# Altium PCB PCB_RR-Updates-v1.0.PcbDoc (part 1 of 2)
Units mil, origin at the board's own origin, x right, y up, seen from the top; angles counter-clockwise.
Board outline 3045 x 2450 mil, 2 copper layers (Top Layer, Bottom Layer), stack 62.205 mil thick; 73 components, 57 nets, 209 pads, 80 vias.
Unrouted connection lines stored in the file: 2.
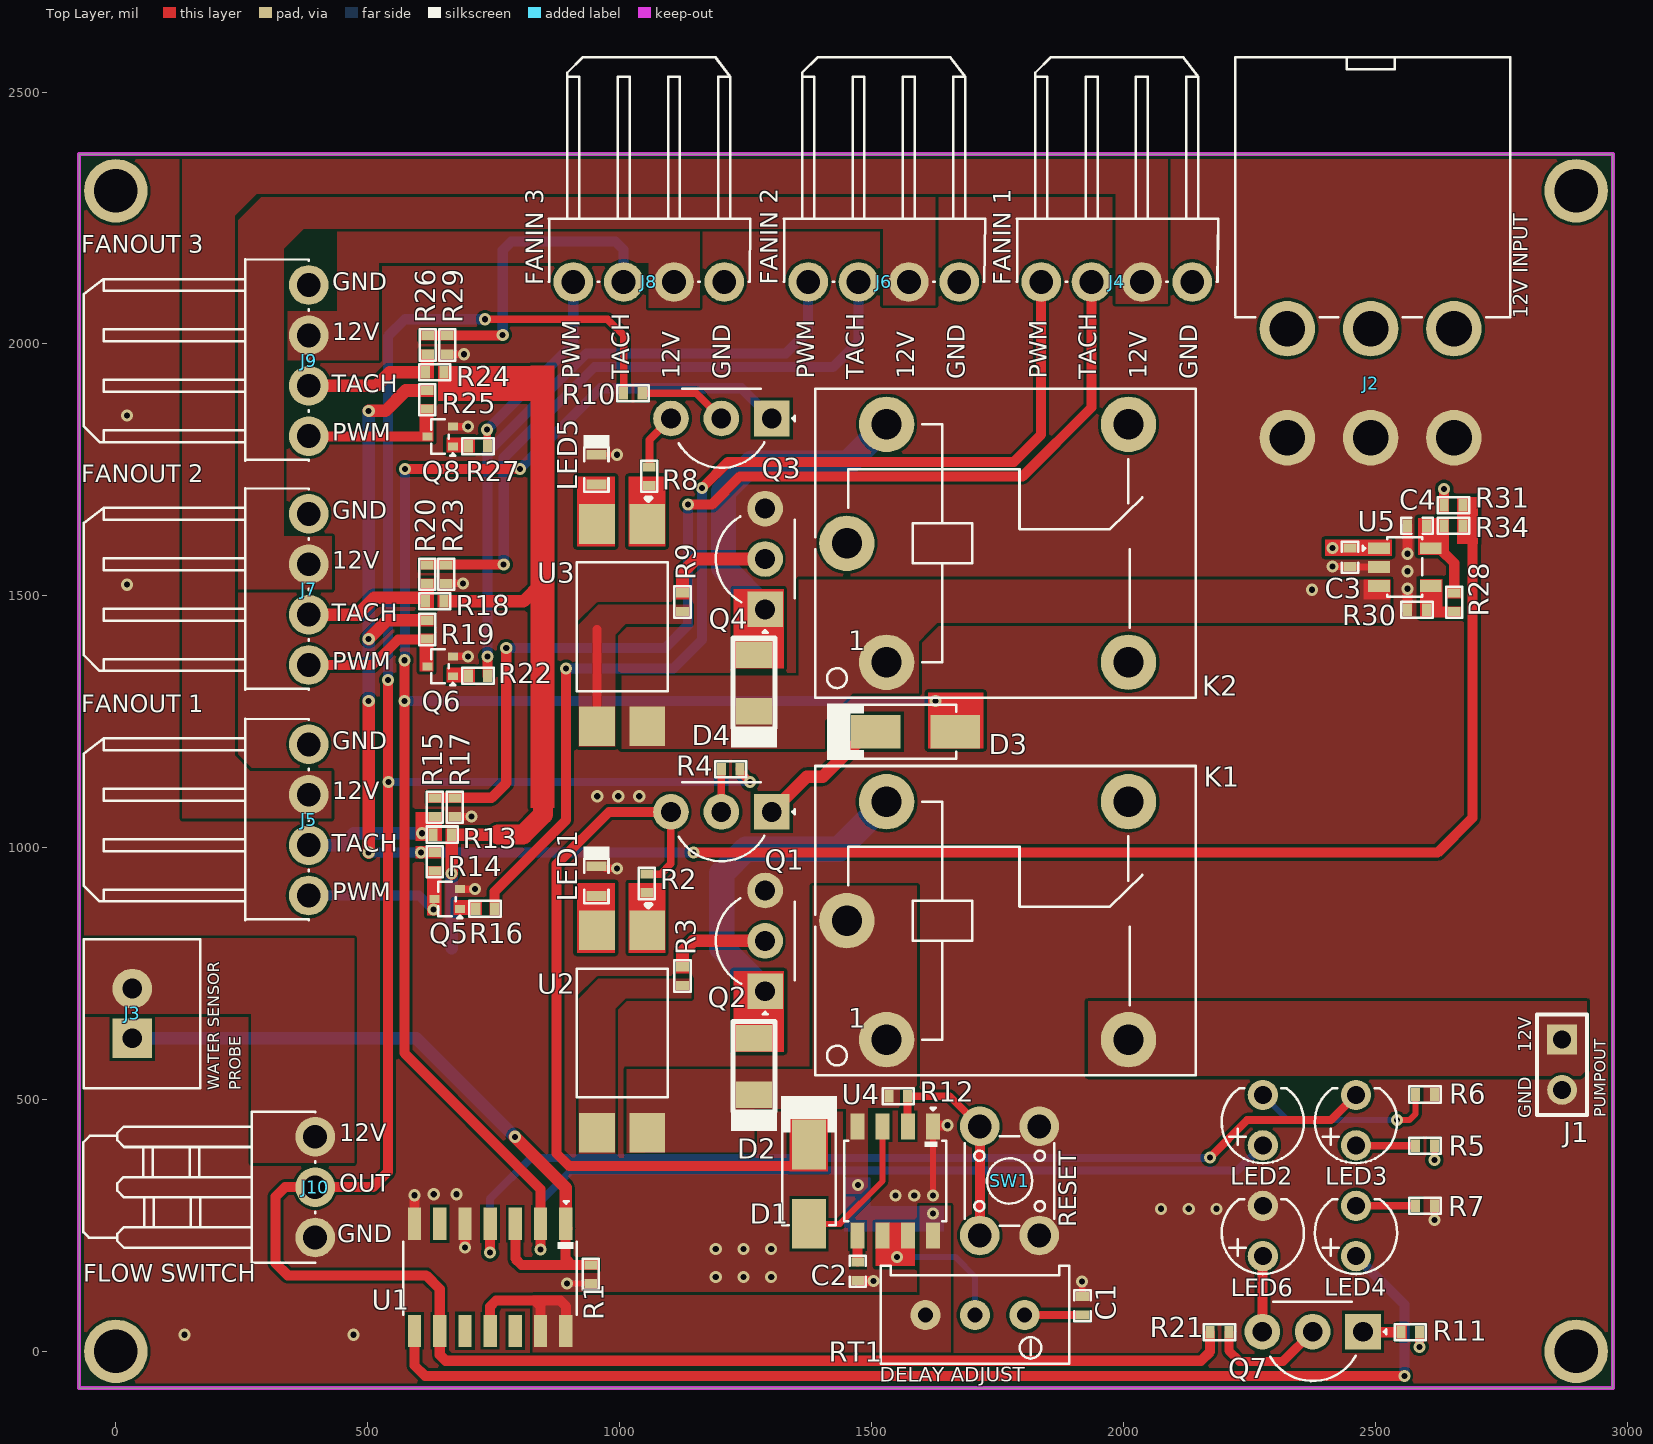
[diagram p0: Top Layer view]
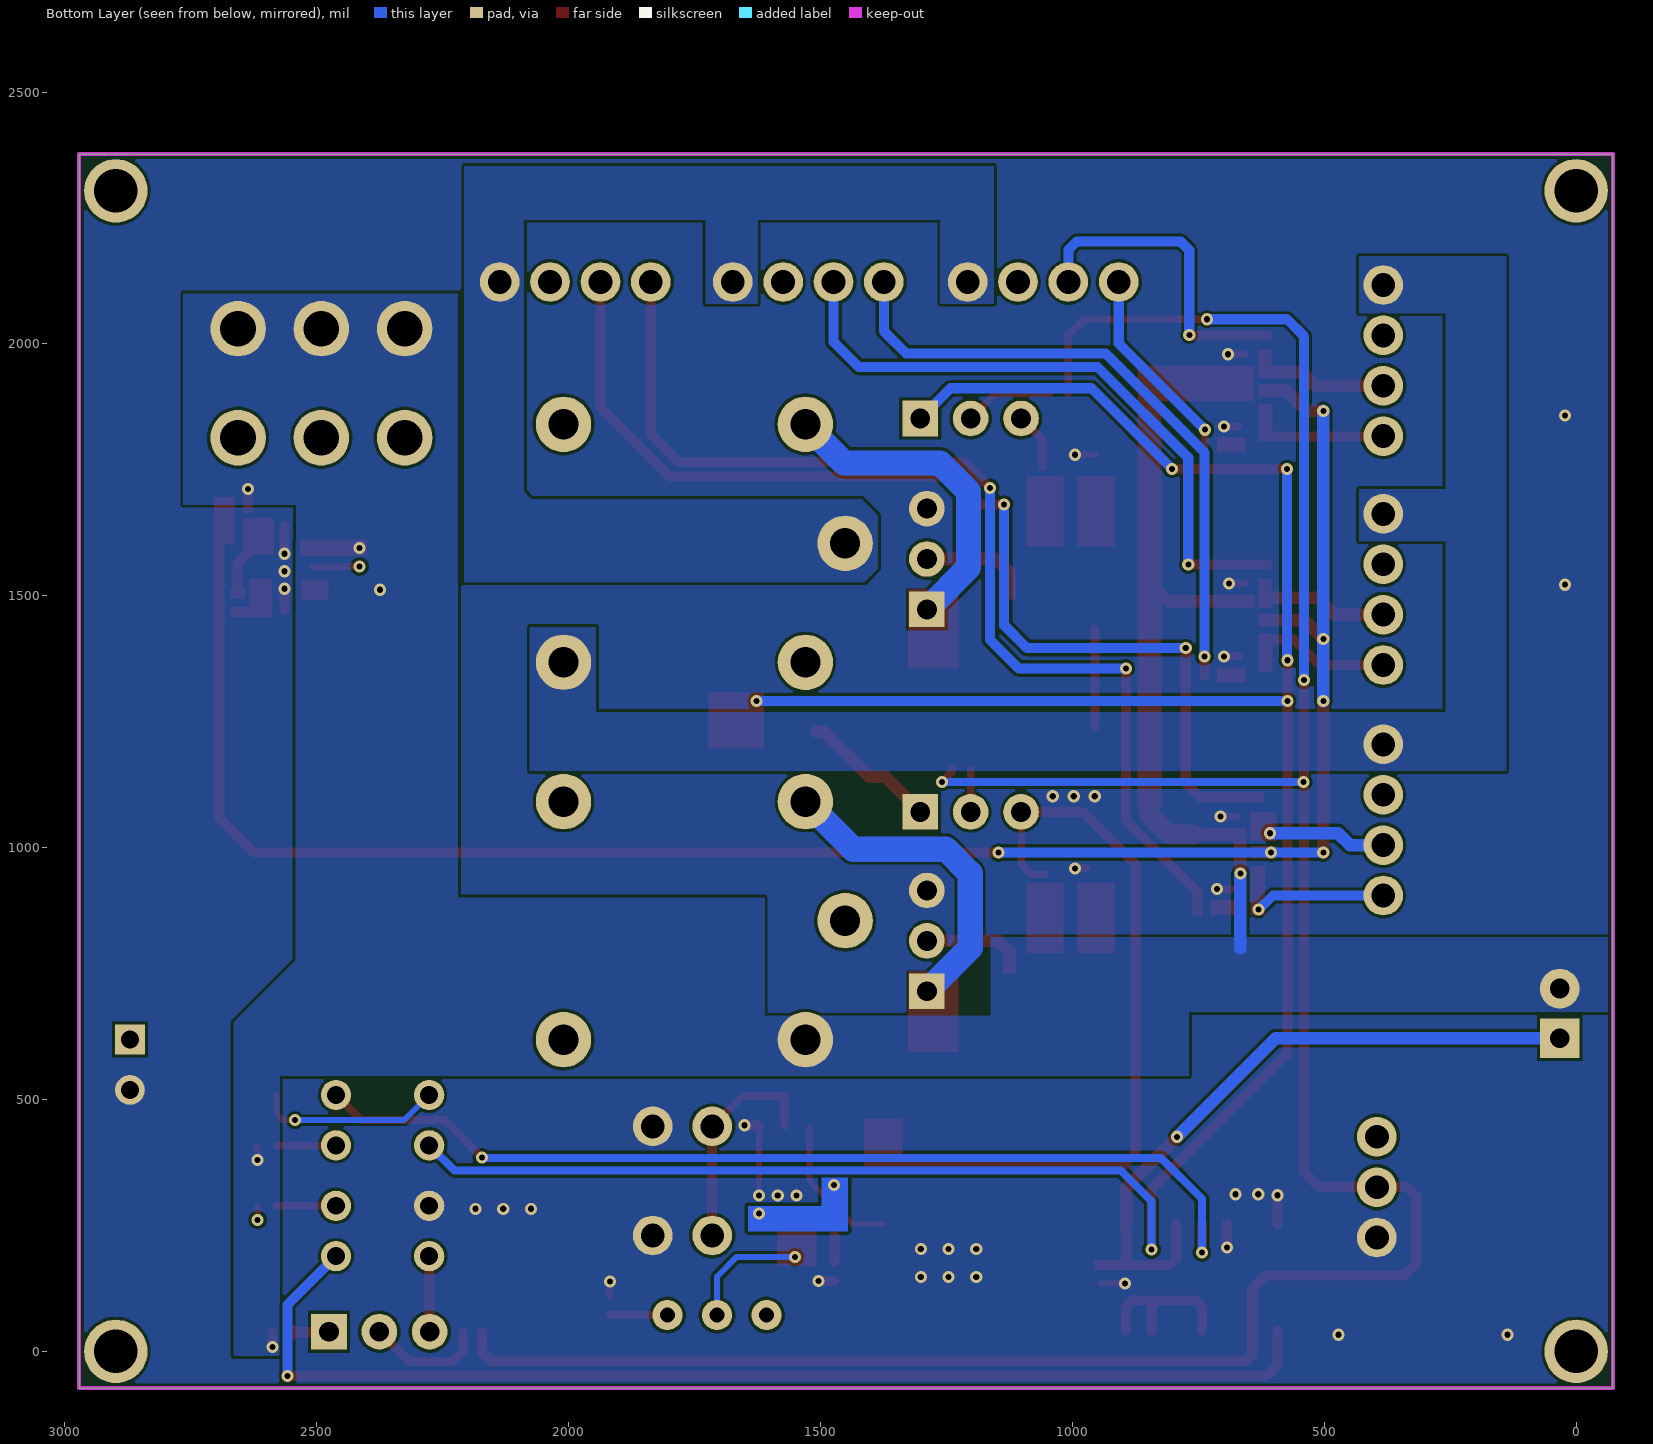
[diagram p1: Bottom Layer view, seen from below]
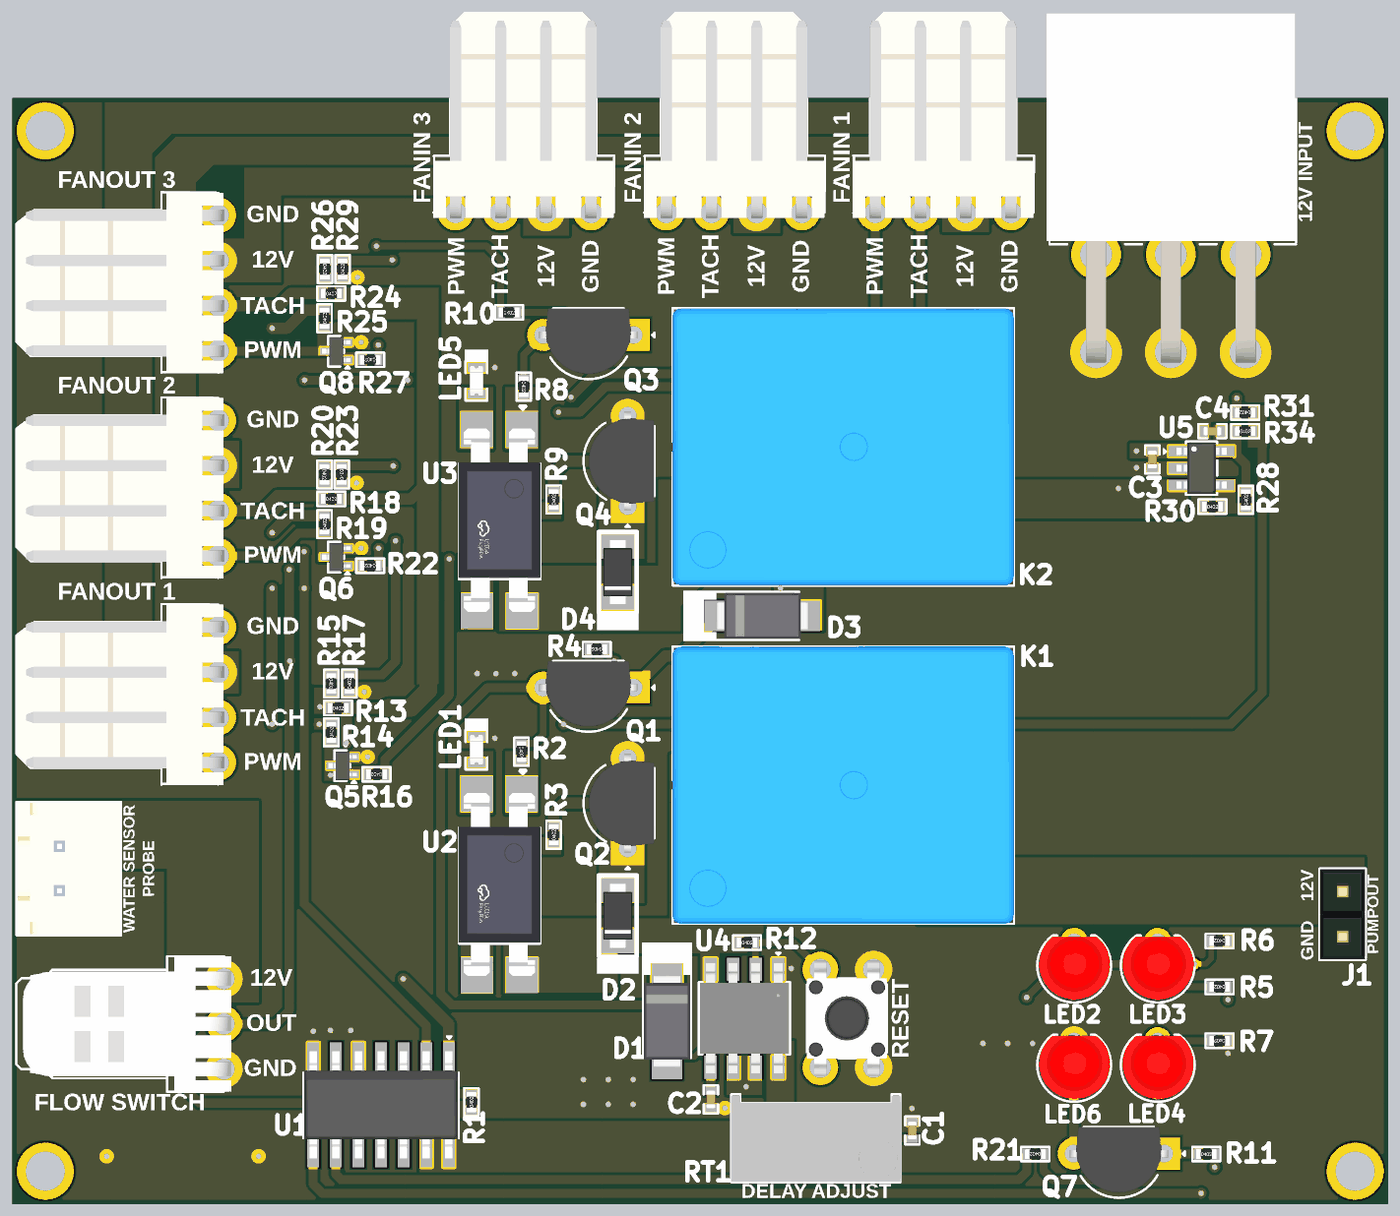
[diagram p2: 3D render of the assembled board from above, using the file's embedded part models]

## Layer stack, top to bottom
Top Solder: solder mask 0.3937, Solder Resist, Dk 3.3
Top Layer: signal copper 1.378
Dielectric 1: dielectric 59.4488, FR-4, Dk 4.5
Bottom Layer: signal copper 1.378
Bottom Solder: solder mask 0.3937, Solder Resist, Dk 3.3

## Board outline
-73,-73 2972,-73 2972,2377 -73,2377

## Design rules (kind name [scope] priority, off if disabled: settings)
BoardOutlineClearance [All] p1: gap=0 ignorepadtopadclearanceinfootprint=FALSE except(10: Poly-OutlineEdge)
Clearance [All] p1: gap=6 ignorepadtopadclearanceinfootprint=FALSE except(0: Arc-Hole Track-Hole SMDPad-Hole THPad-Hole Via-Hole Fill-Hole Poly-Hole Region-Hole Text-Hole)
HoleToHoleClearance [All] p1: gap=0 allowstackedmicrovias=TRUE
MinimumSolderMaskSliver [All] p1: minsoldermaskwidth=0
PolygonConnect [All] p1: connectstyle=Direct reliefconductorwidth=10 reliefentries=4 polygonreliefangle="90 Angle" airgapwidth=10
RoutingVias [All] p1: holewidth=12 width=24 viastyle="Through Hole" minholewidth=12 minwidth=24 maxholewidth=2362 maxwidth=3938
SilkToSilkClearance [All] p1: silktosilkclearance=0
SilkToSolderMaskClearance [IsPad] p1: minsilkscreentomaskgap=0 clearancetoexposedcopper=TRUE
SolderMaskExpansion [All] p1: expansion=4 istentingtop=FALSE
UnRoutedNet [All] p1: checkbadconnections=TRUE
Width [All] p1: maxlimit=100 minlimit=10 preferedwidth=10
25 further rules are at their usual default settings.

## Components (designator, comment, footprint, x,y, rotation, side; value= is the part's Value field where it differs from the comment)
C1 "10nF" Cap-0402 1919,90.5 r270 top locked
C2 "10nF" Cap-0402 1473,159 r90 top
C3 "10uF" Cap-0402 2450,1576.5 r90 top locked
C4 "10uF" Cap-0402 2583,1639 r0 top locked
D1 "SS34" SMA 1376,332 r270 top locked
D2 "SM4007PL A7 46MIL" SOD-123FL 1267,565.7 r90 top locked
D3 "SS34" SMA 1587.26,1230 r0 top locked
D4 "SM4007PL A7 46MIL" SOD-123FL 1267,1326.7 r90 top locked
J1 "X6511WV-02H-C60D30" HDR1X2_ 2871,619 r270 top locked
J2 "4.2-2*3AW" 4.2-2*3AW 2491,1922 r180 top locked
J3 "B2B-XH-A(LF)(SN)" B2B-XH-A(LF)(SN)_ 32.69,671 r90 top locked
J4 "HC-2510-4AW" HC-2510-4AW 1987,2123 r180 top locked
J5 "HC-2510-4AW" HC-2510-4AW 383,1055 r270 top locked
J6 "HC-2510-4AW" HC-2510-4AW 1524.36,2123 r180 top locked
J7 "HC-2510-4AW" HC-2510-4AW 383,1512.64 r270 top locked
J8 "HC-2510-4AW" HC-2510-4AW 1058,2123 r180 top locked
J9 "HC-2510-4AW" HC-2510-4AW 383,1967 r270 top locked
J10 "KH-HX2.54-03PW" KH-HX2.54-03PW 395.54,326 r270 top locked
K1 "SRD-12VDC-SL-C" SRD-12VDC-SL-C 1730.79,855 r0 top locked
K2 "SRD-12VDC-SL-C" SRD-12VDC-SL-C 1730.79,1604.22 r0 top locked
LED1 "Blue" LED-0603 954,933.53 r90 top locked
LED2 "Green-yellow" "TH LED Green 3MM" 2277,459 r90 top locked
LED3 "204-10SURD/S530-A3-L" "TH LED Red 3MM" 2462,459 r90 top locked
LED4 "204-10SURD/S530-A3-L" "TH LED Red 3MM" 2462,239 r90 top locked
LED5 "Blue" LED-0603 954,1750.53 r90 top locked
LED6 "Green-yellow" "TH LED Green 3MM" 2277,239 r90 top locked
Q1 "BC547BTA" TO-92-3L 1202,1071 r180 top locked
Q2 "BC547BTA" TO-92-3L 1288.95,815 r90 top locked
Q3 "BC547BTA" TO-92-3L 1202,1852 r180 top locked
Q4 "BC547BTA" TO-92-3L 1288.95,1573 r90 top locked
Q5 "MMBT3904T-7-F" SOT-523 658,898 r90 top locked
Q6 "MMBT3904T-7-F" SOT-523 644,1360 r90 top locked
Q7 "BC547BTA" TO-92-3L 2376,39 r180 top locked
Q8 "MMBT3904T-7-F" SOT-523 644,1816 r90 top locked
R1 "10K" Res-0402 943,153 r90 top locked
R2 "470R" Res-0402 1054,929 r270 top locked
R3 "2.4k" Res-0402 1125,745 r90 top locked value=2.4kR
R4 "2.4k" Res-0402 1220.5,1156 r180 top locked value=2.4kR
R5 "470R" Res-0402 2599,408 r180 top locked
R6 "470R" Res-0402 2599,510 r180 top locked
R7 "470R" Res-0402 2599,289 r180 top locked
R8 "470R" Res-0402 1059,1737.5 r270 top locked
R9 "2.4k" Res-0402 1125,1487.5 r90 top locked value=2.4kR
R10 "2.4k" Res-0402 1026.5,1902 r0 top locked value=2.4kR
R11 "470R" Res-0402 2569.5,38 r0 top locked
R12 "10K" Res-0402 1553.14,506.36 r0 top locked
R13 "4.7K" Res-0402 648,1026 r0 top locked
R14 "4.7K" Res-0402 633,972 r90 top locked
R15 "27K" Res-0402 633,1080 r270 top locked value=27kR
R16 "4.7K" Res-0402 733,879 r180 top locked
R17 "10K" Res-0402 673,1080 r90 top locked
R18 "4.7K" Res-0402 633,1489 r0 top locked
R19 "4.7K" Res-0402 618,1433 r90 top locked
R20 "27K" Res-0402 618,1543 r270 top locked value=27kR
R21 "2.4k" Res-0402 2191,38 r180 top locked value=2.4kR
R22 "4.7K" Res-0402 719,1341 r180 top locked
R23 "10K" Res-0402 656,1543 r90 top locked
R24 "4.7K" Res-0402 633,1944 r0 top locked
R25 "4.7K" Res-0402 618,1889 r90 top locked
R26 "27K" Res-0402 619,1998 r270 top locked value=27kR
R27 "4.7K" Res-0402 719,1797 r180 top locked
R28 "100K" Res-0402 2657,1487 r90 top locked
R29 "10K" Res-0402 658,1998 r90 top locked
R30 "33K" Res-0402 2583,1472 r0 top locked
R31 "0R" Res-0402 2655.5,1680 r180 top locked
R34 "0R" Res-0402 2655.5,1639 r0 top locked
RT1 "3296W-1-105" 3296W-1-105 1705.58,72 r180 top locked
SW1 "TSC016A03526A" TSC016A03526A 1774.27,338.4 r270 top locked
U1 "HEF4069UBT,653" SOIC-14 743,147 r270 top locked
U2 "PC817C" PC817C 1005,635 r270 top locked
U3 "PC817C" PC817C 1005,1441.79 r270 top locked
U4 "NE555DTR(XBLW)" SOP-8 1547.27,338.4 r270 top locked
U5 "SPX3819M5-L-1-8/TR" SOT-23-5 2559,1557 r0 top locked

## Footprints (in the part's own frame and the unit in brackets; to place one, negate y for a bottom-side part, rotate by r counter-clockwise, add the part's x,y. Pads: shape width x height; smd on the part's side, far side on the other; paste and mask are expansions set on the pad)
4.2-2*3AW [mm]
  round 2.8 hole 1.8 paste+0 mask+0.051: 1(-4.2,-2.75) 2(-4.2,2.75) 3(0,-2.75) 4(0,2.75) 5(4.2,-2.75) 6(4.2,2.75)
  silkscreen extent -7.04,-16.43 6.82,-3.33, body extent -7,-16.32 7,3.32, height 10.7
3296W-1-105 [mil]
  round 60 hole 30 paste+0 mask+2: 1(-98.43,0) 2(0,0) 3(98.42,0)
  silkscreen extent -187,-98 187,96, body extent -188,-95 188,95, height 454
B2B-XH-A(LF)(SN)_ [mm]
  rect 2x2 hole 1: 1(-1.25,0)
  round 2 hole 1: 2(1.25,0)
  silkscreen extent -3.78,-3.43 3.74,2.44, body extent -3.72,-3.37 3.68,2.38, height 7
Cap-0402 [mil]
  rect 18x25 smd mask+2.36: 1(-18.5,0) 2(18.5,0)
  silkscreen extent -31,-16 31,16, body extent -20,-10 20,10, height 19
HC-2510-4AW [mm]
  round 2 hole 1.2 paste+0 mask+0.05: 1(-3.81,0) 2(-1.27,0) 3(1.27,0) 4(3.81,0)
  silkscreen extent -5.11,-11.34 5.05,0, body extent -5.08,-11.31 5.08,0.31, height 5.8
HDR1X2_ [mm] "CONN HEADER VERT 2POS 2.54MM"
  rect 1.5x1.5 hole 0.9: 1(0,0)
  round 1.5 hole 0.9: 2(2.54,0)
  silkscreen extent -1.27,-1.27 3.81,1.27, body extent -1.27,-1.27 3.81,1.27, height 8.44
KH-HX2.54-03PW [mm]
  round 2 hole 1.2 paste+0 mask+0.051: 1(-2.54,0) 2(0,0) 3(2.54,0)
  silkscreen extent -3.81,-11.68 3.81,0, body extent -3.81,-11.3 3.81,0.4, height 5.65
LED-0603 [mm]
  rect 0.5x1 smd: 1(-0.75,0) 2(0.75,0)
  silkscreen extent -1.12,-0.66 1.75,0.66, body extent -0.82,-0.37 0.82,0.36, height 0.68
PC817C [mm]
  rect 2x1.8 smd paste+0 mask+0.051: 1(-5.1,1.27) 2(-5.1,-1.27) 3(5.1,-1.27) 4(5.1,1.27)
  silkscreen extent -6.4,-2.29 3.32,2.31, body extent -5.15,-2.3 5.15,2.3, height 4.64
Res-0402 [mil]
  rect 18x25 smd mask+2.17: 1(-18.5,0) 2(18.5,0)
  silkscreen extent -32,-17 32,16, body extent -23,-11 23,11, height 16
SMA [mm]
  rect 2.5x1.7 smd: 1(-2,0) 2(2,0)
  silkscreen extent -4.45,-1.42 2.06,1.42, body extent -2.6,-1.3 2.6,1.3, height 2.4
SOD-123FL [mm]
  rect 1.34x1.8 smd: 1(-1.43,0) 2(1.43,0)
  silkscreen extent -3.25,-1.17 2.26,1.17, body extent -1.8,-0.82 1.8,0.82, height 0.95
SOIC-14 [mm]
  rect 1.62x0.67 smd: 1(-2.7,3.81) 2(-2.7,2.54) 3(-2.7,1.27) 4(-2.7,0) 5(-2.7,-1.27) 6(-2.7,-2.54) 7(-2.7,-3.81) 8(2.7,-3.81) 9(2.7,-2.54) 10(2.7,-1.27) 11(2.7,0) 12(2.7,1.27) 13(2.7,2.54) 14(2.7,3.81)
  silkscreen extent -3.84,-4.37 1.88,4.37, body extent -3.01,-4.33 3.01,4.33, height 1.75
SOP-8 [mm]
  rect 1.3x0.7 smd: 1(-2.75,1.905) 2(-2.75,0.635) 3(-2.75,-0.635) 4(-2.75,-1.905) 5(2.75,-1.905) 6(2.75,-0.635) 7(2.75,0.635) 8(2.75,1.905)
  silkscreen extent -3.69,-2.57 2.03,2.57, body extent -3.1,-2.5 3.1,2.5, height 1.76
SOT-23-5 [mm]
  rect 1.1x0.6 smd: 1(-1.3,0.95) 2(-1.3,0) 3(-1.3,-0.95) 4(1.3,-0.95) 5(1.3,0.95)
  silkscreen extent -2.13,-1.5 0.88,1.5, body extent -1.4,-1.45 1.4,1.45, height 1.45
SOT-523 [mm]
  rect 0.4x0.51 smd: 1(-0.5,-0.645) 2(0.5,-0.645) 3(0,0.645)
  silkscreen extent -0.97,-0.76 0.86,0.46, body extent -0.8,-0.8 0.8,0.8, height 0.8
SRD-12VDC-SL-C [mil]
  round 110 hole 60 paste+0 mask+2: 1(-200.79,-236.22) 2(279.53,-236.2) 3(279.53,236.2) 4(-200.79,236.22) 5(-279.53,0)
  silkscreen extent -342,-307 413,307, body extent -343,-307 413,307, height 642
"TH LED Green 3MM" [mil]
  round 60 hole 35.43 paste+0 mask+2: 1(-50,0) 2(50,0)
  silkscreen extent -85,-82 63,82, body extent -79,-80 61,78, height 205
"TH LED Red 3MM" [mil]
  round 60 hole 35.43 paste+0 mask+2: 1(-50,0) 2(50,0)
  silkscreen extent -85,-82 63,82, body extent -79,-80 61,78, height 205
TO-92-3L [mm]
  rect 1.8x1.8 hole 1 paste+0 mask+0.051: 1(-2.54,0)
  round 1.8 hole 1 paste+0 mask+0.051: 2(0,0) 3(2.54,0)
  silkscreen extent -3.71,-1.5 2.14,2.48, body extent -2.77,-1.5 2.77,2.2, height 7.79
TSC016A03526A [mm]
  round 2 hole 1.2 paste+0 mask+0.051: 1(-2.75,1.5) 2(2.75,1.5) 3(-2.75,-1.5) 4(2.75,-1.5)
  silkscreen extent -2.25,-2.25 2.25,2.25, body extent -3.25,-2.25 3.25,2.25, height 3.8

## Part data
C1 C2: library part CC0402KRX7R9BB103, "CAP CER 10000PF 50V X7R 0402", Case Code (Imperial)=0402, Case Code (Metric)=1005, Dielectric=X7R, LCSC Part Number=C60133, Manufacturer=Yageo, Max Operating Temperature=125°C, Min Operating Temperature=-55°C, Package Quantity=1, Resistor Type=Ceramic, Tolerance=10%, Voltage=50V, Capacitance=10nF, Case/Package=0402, Category="Ceramic Capacitors", ComponentLink1Description=https://datasheet.ciiva.com/11788/0900766b8079c870-11788375.pdf?src-supplier=RSComponents, ComponentLink1URL=https://datasheet.ciiva.com/11788/0900766b8079c870-11788375.pdf?src-supplier=RSComponents, ComponentLink2Description=https://datasheet.ciiva.com/26862/getdatasheetpartid-138248-26862642.pdf?src-supplier=Verical, ComponentLink2URL=https://datasheet.ciiva.com/26862/getdatasheetpartid-138248-26862642.pdf?src-supplier=Verical, ComponentLink3Description=https://datasheet.ciiva.com/7978/1489800-7978093.pdf?src-supplier=Element14, ComponentLink3URL=https://datasheet.ciiva.com/7978/1489800-7978093.pdf?src-supplier=Element14, ComponentLink4Description=https://datasheet.ciiva.com/28450/1489800-28450377.pdf?src-supplier=Element14, ComponentLink4URL=https://datasheet.ciiva.com/28450/1489800-28450377.pdf?src-supplier=Element14, ComponentLink5Description=https://datasheet.ciiva.com/176/mlccorderingcode-176349.pdf?src-supplier=Digi-Key, ComponentLink5URL=https://datasheet.ciiva.com/176/mlccorderingcode-176349.pdf?src-supplier=Digi-Key, ComponentLink6Description=https://datasheet.ciiva.com/176/mlccorderingcode-176348.pdf?src-supplier=Digi-Key, ComponentLink6URL=https://datasheet.ciiva.com/176/mlccorderingcode-176348.pdf?src-supplier=Digi-Key, ComponentLink7Description=https://datasheet.ciiva.com/176/mlccorderingcode-176350.pdf?src-supplier=Digi-Key, ComponentLink7URL=https://datasheet.ciiva.com/176/mlccorderingcode-176350.pdf?src-supplier=Digi-Key, Depth=0.5mm, Halogen Free="Halogen Free", Height=0.5mm, Item Type=Capacitor, Lead Free="Lead Free", Length=1mm, Manufacturer Part Number=CC0402KRX7R9BB103, Mount="Surface Mount", Packaging="Tape and Reel", Pricing 1="10000=0.00178 (USD)", Radiation Hardening=No, Reach SVHC Compliant=Yes, RoHS=Yes, RoHS Compliant=Yes, Series=CC, Stock 1=995000, Supplier 1=Avnet, Supplier Part Number 1=CC0402KRX7R9BB103, Termination=SMD/SMT, Thickness=0.022inch, Voltage Rating=50V, Voltage Rating (DC)=50V, Width=0.02inch
C3 C4: library part CL05A106MP5NUNC, "CAP CER 10UF 10V X5R 0402", Case Code (Imperial)=0402, Case Code (Metric)=1005, Dielectric=X5R, LCSC Part Number=C315248, Manufacturer=Samsung, Max Operating Temperature=85°C, Min Operating Temperature=-55°C, Package Quantity=1, Tolerance=20%, Voltage Rating=10V, Capacitance=10uF, Case/Package=0402, Category="Ceramic Capacitors", ComponentLink1Description=https://datasheet.ciiva.com/25721/cl05a106mp5nunc-25721584.pdf?src-supplier=Digi-Key, ComponentLink1URL=https://datasheet.ciiva.com/25721/cl05a106mp5nunc-25721584.pdf?src-supplier=Digi-Key, ComponentLink2Description=https://datasheet.ciiva.com/26838/getdatasheetpartid-745310-26838170.pdf?src-supplier=Verical, ComponentLink2URL=https://datasheet.ciiva.com/26838/getdatasheetpartid-745310-26838170.pdf?src-supplier=Verical, Construction=Flat, Contact Plating=Tin, Depth=0.5mm, Item Type=Capacitor, Lead Free="Lead Free", Length=1mm, Manufacturer Part Number=CL05A106MP5NUNC, Mount="Surface Mount", Packaging="Tape and Reel", Pricing 1="10000=0.02537 (USD)", Radiation Hardening=No, RoHS=Yes, RoHS Compliant=Yes, Series=CL, Stock 1=1729850, Supplier 1=Avnet, Supplier Part Number 1=CL05A106MP5NUNC, Termination=Wraparound, Thickness=0.028inch, Width=0.02inch
D1 D3: "0.5mA@40V 40V Single 3A 0.55V@3A SMA(DO-214AC) Schottky Barrier Diodes (SBD) ROHS", LCSC Part Number=C8678, Manufacturer=MDD, Package=SMA(DO-214AC), ComponentLink1Description=LCSC, ComponentLink1URL=https://www.lcsc.com/product-detail/Schottky-Barrier-Diodes-SBD_MDD-Microdiode-Electronics-SS34_C8678.html, Item Type=Diode, Manufacturer Part Number=SS34
D2 D4: "900mA 1.1V@1A 1kV SOD-123FL Diodes - General Purpose ROHS", LCSC Part Number=C2916249, Manufacturer=YONGYUTAI, Package=SOD-123FL, ComponentLink1Description=LCSC, ComponentLink1URL=https://www.lcsc.com/product-detail/Diodes-General-Purpose_YONGYUTAI-SM4007PL-A7-46MIL_C2916249.html, Item Type=Diode, Manufacturer Part Number="SM4007PL A7 46MIL"
J1: "Gold 250V 3A Straight Square Pins 2.5mm 2P 260℃ 6mm -40℃~+105℃ 3mm 2.54mm Plugin Black Brass 1x2P Plugin,P=2.54mm Pin Headers ROHS", LCSC Part Number=C706874, Manufacturer=XKB, Package=Plugin,P=2.54mm, ComponentLink1Description=LCSC, ComponentLink1URL=https://www.lcsc.com/product-detail/Pin-Headers_XKB-Connectivity-X6511WV-02H-C60D30_C706874.html, Item Type="Male Header", Manufacturer Part Number=X6511WV-02H-C60D30
J2: "4.2mm Wire To Board Connector ROHS", LCSC Part Number=C35447, Manufacturer=BOOMELE, Package=Custom, ComponentLink1Description=LCSC, ComponentLink1URL=https://jlcpcb.com/partdetail/boomele_boom_Precision_elec-4_2_23AW/C35447, Item Type="Wire To Board Connector", Manufacturer Part Number=4.2-2*3AW
J3: "Conn Shrouded Header (4 Sides) HDR 2 POS 2.5mm Solder ST Thru-Hole Box", Color=Natural, Contact Resistance=20mR, Current Rating=3A, Housing Color=White, Insulation Resistance=1GR, LCSC Part Number=C158012, Manufacturer=JST, Max Operating Temperature=85°C, Max Voltage Rating (AC)=250V, Min Operating Temperature=-25°C, Supplier Part Number 1=1516276, Category="FFC / FPC", ComponentLink1Description=https://datasheet.ciiva.com/26894/getdatasheetpartid-640357-26894434.pdf?src-supplier=Verical, ComponentLink1URL=https://datasheet.ciiva.com/26894/getdatasheetpartid-640357-26894434.pdf?src-supplier=Verical, ComponentLink2Description=https://datasheet.ciiva.com/11746/0900766b8082653e-11746979.pdf?src-supplier=RSComponents, ComponentLink2URL=https://datasheet.ciiva.com/11746/0900766b8082653e-11746979.pdf?src-supplier=RSComponents, ComponentLink3Description=https://datasheet.ciiva.com/26894/getdatasheetpartid-385291-26894760.pdf?src-supplier=Verical, ComponentLink3URL=https://datasheet.ciiva.com/26894/getdatasheetpartid-385291-26894760.pdf?src-supplier=Verical, ComponentLink4Description=https://datasheet.ciiva.com/8052/5448-8052024.pdf?src-supplier=Element14, ComponentLink4URL=https://datasheet.ciiva.com/8052/5448-8052024.pdf?src-supplier=Element14, ComponentLink5Description=https://datasheet.ciiva.com/20207/523653-20207167.pdf?src-supplier=Rapid+Electronics, ComponentLink5URL=https://datasheet.ciiva.com/20207/523653-20207167.pdf?src-supplier=Rapid+Electronics, Connector Type="Male Pin", Contact Material=Brass, Contact Plating=Tin,Copper,Lead, Depth=5.75mm, Fastening Type=Detent, Housing Material=Polyamide, Item Type="JST Connector", Lead Free="Lead Free", Lead Pitch=2.5mm, Length=7.4mm, Manufacturer Part Number=B2B-XH-A(LF)(SN), Max Current Rating=3A, Max Voltage Rating (DC)=250V, Mount="Through Hole", Number of Contacts=2, Number of Positions=2, Number of Rows=1, Orientation=Straight, Packaging=Bulk, Pitch=2.5mm, Pricing 1="100=0.06860, 1000=0.04800, 2500=0.04520, 5000=0.04230, 10000=0.03950, 20000=0.03660 (GBP)", REACH SVHC="No SVHC", RoHS=Yes, Stock 1=219240, Supplier 1=Farnell, Termination=Solder, Voltage Rating=250V, Voltage Rating (AC)=250V, Wire/Cable Gauge=22AWG
J4 J5 J6 J7 J8 J9: "1x4P 4P 1 Tin 2.54mm 4 -25℃~+85℃ Brass 4A Right-Angle Push-Pull,P=2.54mm Wire To Board Connector ROHS", LCSC Part Number=C2982043, Manufacturer=HCTL, Package=Push-Pull,P=2.54mm, ComponentLink1Description=LCSC, ComponentLink1URL=https://www.lcsc.com/product-detail/Wire-To-Board-Connector_HCTL-HC-2510-4AW_C2982043.html, Item Type="Wire To Board Connector", Manufacturer Part Number=HC-2510-4AW
J10: "1x3P 3P 1 2.54mm 3 Right-Angle Push-Pull,P=2.54mm Wire To Board Connector ROHS", LCSC Part Number=C3250035, Manufacturer="Shenzhen Kinghelm Elec", Package=Push-Pull,P=2.54mm, ComponentLink1Description=LCSC, ComponentLink1URL=https://www.lcsc.com/product-detail/Wire-To-Board-Connector_Shenzhen-Kinghelm-Elec-KH-HX2-54-03PW_C3250035.html, Item Type="Wire To Board Connector", Manufacturer Part Number=KH-HX2.54-03PW
K1 K2: "250V@AC 12V 15A SPDT (1 Form C) Plugin,15.6x19.2mm Power Relays ROHS", LCSC Part Number=C30431, Manufacturer="Ningbo Forward Relay", Category=Uncategorized, Manufacturer Part Number=SRD-12VDC-SL-C, RoHS=No, Supplier=LCSC
LED1 LED5: library part NCD0603B3, "blue 0603 Light Emitting Diodes (LED) ROHS", LCSC Part Number=C158101, Manufacturer="Foshan NationStar Optoelectronics", Package=0603, ComponentLink1Description=LCSC, ComponentLink1URL=https://www.lcsc.com/product-detail/Light-Emitting-Diodes-LED_Foshan-NationStar-Optoelectronics-NCD0603B3_C158101.html, Item Type=LED, Manufacturer Part Number=NCD0603B3
LED2 LED6: library part 204-10SYGD/S530-E3, "LED Single Standard Yellow Green 573nm 25mA 2-Pin T-1 Bag", Case/Package=T, Forward Current=25mA, Forward Voltage=2.4V, LCSC Part Number=C85161, Manufacturer=Everlight, Max Operating Temperature=85°C, Min Operating Temperature=-40°C, Power Dissipation=60W, Reverse Voltage=5V, Supplier Part Number=1080-204-10SYGD/S530-E3TR-ND, ComponentLink1Description=https://datasheet.ciiva.com/26901/getdatasheetpartid-707371-26901329.pdf?src-supplier=Verical, ComponentLink1URL=https://datasheet.ciiva.com/26901/getdatasheetpartid-707371-26901329.pdf?src-supplier=Verical, Depth=4mm, Dominant Wavelength=573nm, Item Type=LED, Length=4mm, Lens Style=Diffused,Colored, Luminous Intensity=100mcd, Manufacturer Part Number=204-10SYGD/S530-E3, Mounting Technology="Through Hole", Number of Elements=1, Packaging="Tape and Reel", Pins=2, Pricing="3000=0.10482, 5000=0.09847, 10000=0.09212, 25000=0.08449, 50000=0.08132, 100000=0.07941 (USD)", Radiation Hardening=No, RoHS=Yes, RoHS Compliant=Yes, Supplier=Digikey, Viewing Angle=45°, Wavelength=573nm
LED3 LED4: "20mA 624nm -40℃~+85℃ Red 40° 3mm圆形灯头 60mW Plugin,D=3mm Light Emitting Diodes (LED) ROHS", LCSC Part Number=C99771, Manufacturer="Everlight Elec", Package=Plugin,D=3mm, ComponentLink1Description=LCSC, ComponentLink1URL=https://www.lcsc.com/product-detail/Light-Emitting-Diodes-LED_Everlight-Elec-204-10SURD-S530-A3-L_C99771.html, Item Type=LED, Manufacturer Part Number=204-10SURD/S530-A3-L
Q1 Q2 Q3 Q4 Q7: "TRANS NPN 45V 0.1A TO92-3", LCSC Part Number=C258144, Manufacturer="ON Semiconductor / Fairchild", Supplier Part Number=4008015, ComponentLink1Description=https://datasheet.ciiva.com/5770/bc546-5770589.pdf?src-supplier=Farnell, ComponentLink1URL=https://datasheet.ciiva.com/5770/bc546-5770589.pdf?src-supplier=Farnell, ComponentLink2Description=https://datasheet.ciiva.com/971/bc546-971924.pdf?src-supplier=Digikey, ComponentLink2URL=https://datasheet.ciiva.com/971/bc546-971924.pdf?src-supplier=Digikey, ComponentLink3Description=https://datasheet.ciiva.com/971/bc546-971925.pdf?src-supplier=Digikey, ComponentLink3URL=https://datasheet.ciiva.com/971/bc546-971925.pdf?src-supplier=Digikey, ComponentLink4Description=https://datasheet.ciiva.com/11197/bc550-11197771.pdf?src-supplier=Avnet, ComponentLink4URL=https://datasheet.ciiva.com/11197/bc550-11197771.pdf?src-supplier=Avnet, ComponentLink5Description=https://datasheet.ciiva.com/4722/bc547-4722169.pdf?src-supplier=Mouser, ComponentLink5URL=https://datasheet.ciiva.com/4722/bc547-4722169.pdf?src-supplier=Mouser, ComponentLink6Description=https://datasheet.ciiva.com/1195/1868820-1195467.pdf?src-supplier=Element14, ComponentLink6URL=https://datasheet.ciiva.com/1195/1868820-1195467.pdf?src-supplier=Element14, ComponentLink7Description=https://datasheet.ciiva.com/1195/1868820-1195468.pdf?src-supplier=Element14, ComponentLink7URL=https://datasheet.ciiva.com/1195/1868820-1195468.pdf?src-supplier=Element14, ComponentLink8Description=https://datasheet.ciiva.com/17179/bc546-17179703.pdf?src-supplier=Future+Electronics, ComponentLink8URL=https://datasheet.ciiva.com/17179/bc546-17179703.pdf?src-supplier=Future+Electronics, Item Type=BJTs, Lead Free=5697LeadFree, Manufacturer Part Number=BC547BTA, Pricing="2000=0.041, 8000=0.0391, 20000=0.0379, 50000=0.0368, 80000=0.0351 (USD)", RoHS=Yes, Stock=10000, Supplier="Future Electronics"
Q5 Q6 Q8: "TRANS NPN 40V 0.2A SOT523", LCSC Part Number=C239187, Manufacturer="Diodes Zetex", Supplier Part Number=4140292, Category=BJTs, ComponentLink1Description=https://datasheet.ciiva.com/15139/getdatasheetpartid-142850-15139485.pdf?src-supplier=Verical, ComponentLink1URL=https://datasheet.ciiva.com/15139/getdatasheetpartid-142850-15139485.pdf?src-supplier=Verical, ComponentLink2Description=https://datasheet.ciiva.com/11199/ds30270-11199009.pdf?src-supplier=Avnet, ComponentLink2URL=https://datasheet.ciiva.com/11199/ds30270-11199009.pdf?src-supplier=Avnet, ComponentLink3Description=https://datasheet.ciiva.com/17053/0900766b80e49818-17053736.pdf?src-supplier=Allied+Electronics, ComponentLink3URL=https://datasheet.ciiva.com/17053/0900766b80e49818-17053736.pdf?src-supplier=Allied+Electronics, ComponentLink4Description=https://datasheet.ciiva.com/8029/ds30270-8029717.pdf?src-supplier=Element14, ComponentLink4URL=https://datasheet.ciiva.com/8029/ds30270-8029717.pdf?src-supplier=Element14, ComponentLink5Description=https://datasheet.ciiva.com/22711/480146-22711751.pdf?src-supplier=Element14, ComponentLink5URL=https://datasheet.ciiva.com/22711/480146-22711751.pdf?src-supplier=Element14, ComponentLink6Description=https://datasheet.ciiva.com/4723/ds30270-4723401.pdf?src-supplier=Mouser, ComponentLink6URL=https://datasheet.ciiva.com/4723/ds30270-4723401.pdf?src-supplier=Mouser, ComponentLink7Description=https://datasheet.ciiva.com/6360/ds30270-6360919.pdf?src-supplier=Digikey, ComponentLink7URL=https://datasheet.ciiva.com/6360/ds30270-6360919.pdf?src-supplier=Digikey, Item Type=Transistor, Manufacturer Part Number=MMBT3904T-7-F, Pricing="3000=0.0261, 9000=0.0252, 15000=0.0248, 60000=0.0236, 90000=0.0229 (USD)", RoHS=Yes, Stock=36000, Supplier="Future Electronics"
R1 R12 R17 R23 R29: library part RC0402FR-0710KL, "RES 10K OHM 1% 1/16W 0402", Case Code (Imperial)=0402, Case Code (Metric)=1005, LCSC Part Number=C60490, Manufacturer=Yageo, Max Operating Temperature=155°C, Max Power Dissipation=63mW, Min Operating Temperature=-55°C, Power Rating=62.5mW, Resistance=10kR, Resistance Tolerance=1%, Resistor Type="Thick Film", Supplier Part Number 1=603-RC0402FR-0710KL, Temperature Coefficient=100ppm/°C, Voltage Rating=50V, Case/Package=0402, Category="Chip SMD Resistors", ComponentLink1Description=https://datasheet.ciiva.com/7660/38568-7660787.pdf?src-supplier=Element14, ComponentLink1URL=https://datasheet.ciiva.com/7660/38568-7660787.pdf?src-supplier=Element14, ComponentLink2Description=https://datasheet.ciiva.com/7849/1686128-7849814.pdf?src-supplier=Element14, ComponentLink2URL=https://datasheet.ciiva.com/7849/1686128-7849814.pdf?src-supplier=Element14, ComponentLink3Description=https://datasheet.ciiva.com/7983/1018594-7983486.pdf?src-supplier=Element14, ComponentLink3URL=https://datasheet.ciiva.com/7983/1018594-7983486.pdf?src-supplier=Element14, ComponentLink4Description=https://datasheet.ciiva.com/22747/1018594-22747512.pdf?src-supplier=Element14, ComponentLink4URL=https://datasheet.ciiva.com/22747/1018594-22747512.pdf?src-supplier=Element14, ComponentLink5Description=https://datasheet.ciiva.com/12667/pyu-rc0402-51-rohs-l-6-r-12667067.pdf?src-supplier=Mouser, ComponentLink5URL=https://datasheet.ciiva.com/12667/pyu-rc0402-51-rohs-l-6-r-12667067.pdf?src-supplier=Mouser, ComponentLink6Description=https://datasheet.ciiva.com/7849/1784430-7849813.pdf?src-supplier=Element14, ComponentLink6URL=https://datasheet.ciiva.com/7849/1784430-7849813.pdf?src-supplier=Element14, ComponentLink7Description=https://datasheet.ciiva.com/7849/1784430-7849815.pdf?src-supplier=Element14, ComponentLink7URL=https://datasheet.ciiva.com/7849/1784430-7849815.pdf?src-supplier=Element14, Construction=Rectangular, Depth=0.5mm, Features="Moisture Resistant", Height=0.32mm, Item Type=Resistor, Lead Free="Lead Free", Lead Pitch=0.2mm, Length=1mm, Manufacturer Part Number=RC0402FR-0710KL, Military Standard=Not, Number of Pins=2, Number of Terminations=2, Packaging="Tape and Reel", Pricing 1="1=0.10000, 10=0.01400, 50=0.01400, 100=0.00500, 1000=0.00300, 10000=0.00200 (USD)", REACH SVHC="No SVHC", RoHS=Yes, RoHS Compliant=Yes, Series=RC, Stock 1=18648329, Supplier 1=Mouser, Termination=SMD/SMT, Tolerance=1%, Voltage Rating (DC)=50V, Width=0.5mm, Working Voltage=50V
R2 R5 R6 R7 R8 R11: library part RC0402FR-07470RL, "RES 470 OHM 1% 1/16W 0402", Case Code (Imperial)=0402, Case Code (Metric)=1005, LCSC Part Number=C114877, Manufacturer=Yageo, Max Operating Temperature=155°C, Max Power Dissipation=63mW, Min Operating Temperature=-55°C, Package Quantity=1, Power Rating=62.5mW, Resistance Tolerance=1%, Resistor Type="Thick Film", Temperature Coefficient=100ppm/°C, Voltage Rating=50V, Case/Package=0402, ComponentLink1Description=https://datasheet.ciiva.com/46412/1018594-46412838.pdf?src-supplier=Element14, ComponentLink1URL=https://datasheet.ciiva.com/46412/1018594-46412838.pdf?src-supplier=Element14, ComponentLink2Description=https://datasheet.ciiva.com/2453/pyu-r-int-thick-7-2453377.pdf?src-supplier=Digikey, ComponentLink2URL=https://datasheet.ciiva.com/2453/pyu-r-int-thick-7-2453377.pdf?src-supplier=Digikey, ComponentLink3Description=https://datasheet.ciiva.com/2453/pyu-r-int-thick-7-2453378.pdf?src-supplier=Digikey, ComponentLink3URL=https://datasheet.ciiva.com/2453/pyu-r-int-thick-7-2453378.pdf?src-supplier=Digikey, ComponentLink4Description=https://datasheet.ciiva.com/2453/pyu-r-int-thick-7-2453376.pdf?src-supplier=Digikey, ComponentLink4URL=https://datasheet.ciiva.com/2453/pyu-r-int-thick-7-2453376.pdf?src-supplier=Digikey, ComponentLink5Description=https://datasheet.ciiva.com/7850/1018594-7850015.pdf?src-supplier=Element14, ComponentLink5URL=https://datasheet.ciiva.com/7850/1018594-7850015.pdf?src-supplier=Element14, ComponentLink6Description=https://datasheet.ciiva.com/7850/1018594-7850014.pdf?src-supplier=Element14, ComponentLink6URL=https://datasheet.ciiva.com/7850/1018594-7850014.pdf?src-supplier=Element14, ComponentLink7Description=https://datasheet.ciiva.com/15189/getdatasheetpartid-330246-15189463.pdf?src-supplier=Verical, ComponentLink7URL=https://datasheet.ciiva.com/15189/getdatasheetpartid-330246-15189463.pdf?src-supplier=Verical, Construction=Rectangular, Depth=0.5mm, Features="Moisture Resistant", Height=0.016inch, Item Type=Resistor, Lead Free="Lead Free", Length=1mm, Manufacturer Part Number=RC0402FR-07470RL, Military Standard=Not, Number of Terminations=2, Packaging="Tape and Reel", Pricing="10000=0.00085 (USD)", Reach SVHC Compliant=No, RoHS=Yes, RoHS Compliant=Yes, Series=RC, Stock=10000, Supplier=Avnet, Supplier Part Number=RC0402FR-07470RL, Termination=SMD/SMT, Tolerance=1%, Voltage Rating (AC)=50V, Width=0.02inch, Working Voltage=50V
R3 R4 R9 R10 R21: library part RC0402FR-072K4L, "RES 2.4K OHM 1% 1/16W 0402", Case Code (Imperial)=0402, Case Code (Metric)=1005, LCSC Part Number=C112296, Manufacturer=Yageo, Max Operating Temperature=155°C, Max Power Dissipation=63mW, Min Operating Temperature=-55°C, Package Quantity=1, Resistance Tolerance=1%, Resistor Type="Thick Film", Supplier Part Number 1=3635539, Temperature Coefficient=100ppm/°C, Voltage Rating=50V, Case/Package=0402, Category="Chip SMD Resistors", ComponentLink1Description=https://datasheet.ciiva.com/7849/1018594-7849930.pdf?src-supplier=Element14, ComponentLink1URL=https://datasheet.ciiva.com/7849/1018594-7849930.pdf?src-supplier=Element14, ComponentLink2Description=https://datasheet.ciiva.com/7849/1018594-7849931.pdf?src-supplier=Element14, ComponentLink2URL=https://datasheet.ciiva.com/7849/1018594-7849931.pdf?src-supplier=Element14, ComponentLink3Description=https://datasheet.ciiva.com/2453/pyu-r-int-thick-7-2453428.pdf?src-supplier=Digi-Key, ComponentLink3URL=https://datasheet.ciiva.com/2453/pyu-r-int-thick-7-2453428.pdf?src-supplier=Digi-Key, ComponentLink4Description=https://datasheet.ciiva.com/2453/pyu-r-int-thick-7-2453429.pdf?src-supplier=Digi-Key, ComponentLink4URL=https://datasheet.ciiva.com/2453/pyu-r-int-thick-7-2453429.pdf?src-supplier=Digi-Key, ComponentLink5Description=https://datasheet.ciiva.com/2453/pyu-r-int-thick-7-2453427.pdf?src-supplier=Digi-Key, ComponentLink5URL=https://datasheet.ciiva.com/2453/pyu-r-int-thick-7-2453427.pdf?src-supplier=Digi-Key, ComponentLink6Description=https://datasheet.ciiva.com/12667/pyu-rc0402-51-rohs-l-6-r-12667437.pdf?src-supplier=Mouser, ComponentLink6URL=https://datasheet.ciiva.com/12667/pyu-rc0402-51-rohs-l-6-r-12667437.pdf?src-supplier=Mouser, ComponentLink7Description=https://datasheet.ciiva.com/17423/pyu-rc0402-51-rohs-l-6-r-17423915.pdf?src-supplier=Future+Electronics, ComponentLink7URL=https://datasheet.ciiva.com/17423/pyu-rc0402-51-rohs-l-6-r-17423915.pdf?src-supplier=Future+Electronics, Construction=Rectangular, Depth=0.5mm, Features="Moisture Resistant", Height=0.016inch, Item Type=Resistor, Lead Free="Lead Free", Length=0.039inch, Manufacturer Part Number=RC0402FR-072K4L, Military Standard=Not, Number of Terminations=2, Packaging="Tape and Reel", Power Rating=63mW, Pricing 1="10000=0.001, 50000=0.001, 200000=0.0009, 300000=0.0009, 750000=0.0009, 1000000=0.0009, 2000000=0.0009, 3000000=0.0008, 7500000=0.0008 (USD)", Reach SVHC Compliant=Unknown, RoHS=Yes, RoHS Compliant=Yes, Series=RC, Stock 1=20000, Supplier 1="Future Electronics", Termination=SMD/SMT, Tolerance=1%, Voltage Rating (DC)=50V, Width=0.02inch
R13 R14 R16 R18 R19 R22 R24 R25 R27: library part RC0402FR-074K7L, "RES 4.7K OHM 1% 1/16W 0402", Case Code (Imperial)=0402, Case Code (Metric)=1005, LCSC Part Number=C105871, Manufacturer=Yageo, Max Operating Temperature=155°C, Max Power Dissipation=63mW, Min Operating Temperature=-55°C, Power Rating=62.5mW, Resistance=4.7kR, Resistance Tolerance=1%, Resistor Type="Thick Film", Temperature Coefficient=100ppm/°C, Voltage Rating=50V, Case/Package=0402, Category="Chip SMD Resistors", ComponentLink1Description=https://datasheet.ciiva.com/22661/1686128-22661342.pdf?src-supplier=Element14, ComponentLink1URL=https://datasheet.ciiva.com/22661/1686128-22661342.pdf?src-supplier=Element14, ComponentLink2Description=https://datasheet.ciiva.com/7850/1018594-7850022.pdf?src-supplier=Element14, ComponentLink2URL=https://datasheet.ciiva.com/7850/1018594-7850022.pdf?src-supplier=Element14, ComponentLink3Description=https://datasheet.ciiva.com/7850/1018594-7850023.pdf?src-supplier=Element14, ComponentLink3URL=https://datasheet.ciiva.com/7850/1018594-7850023.pdf?src-supplier=Element14, ComponentLink4Description=https://datasheet.ciiva.com/15215/getdatasheetpartid-328119-15215035.pdf?src-supplier=Verical, ComponentLink4URL=https://datasheet.ciiva.com/15215/getdatasheetpartid-328119-15215035.pdf?src-supplier=Verical, Construction=Rectangular, Depth=0.5mm, Features="Moisture Resistant", Height=0.32mm, Height - Seated (Max)=0.016inch, Item Type=Resistor, Lead Free="Lead Free", Length=1mm, Manufacturer Part Number=RC0402FR-074K7L, Military Standard=Not, Number of Pins=2, Number of Terminations=2, Packaging="Tape and Reel", Pricing 1="10000=0.00085 (USD)", Reach SVHC Compliant=Yes, RoHS=Yes, RoHS Compliant=Yes, Series=RC, Size Code=0402, Stock 1=2420000, Supplier 1=Avnet, Supplier Part Number 1=RC0402FR-074K7L, Termination=SMD/SMT, Tolerance=1%, Voltage Rating (DC)=50V, Width=0.5mm
R15 R20 R26: library part RT0402BRE0727KL, "RES SMD 27K OHM 0.1% 1/16W 0402", Case Code (Imperial)=0402, LCSC Part Number=C853174, Manufacturer=Yageo, Max Operating Temperature=155°C, Max Power Dissipation=63mW, Min Operating Temperature=-55°C, Package Quantity=10000, Supplier Part Number=YAG4364CT-ND, Temperature Coefficient=50ppm/°C, Tolerance=0.1%, Voltage Rating (DC)=50V, Case/Package=0402, Category="Chip SMD Resistors", ComponentLink1Description=https://datasheet.ciiva.com/2582/pyu-rt-1-to-0-05-rohs-l-5-2582721.pdf?src-supplier=Digikey, ComponentLink1URL=https://datasheet.ciiva.com/2582/pyu-rt-1-to-0-05-rohs-l-5-2582721.pdf?src-supplier=Digikey, Height=0.014inch, Item Type=Resistor, Lead Free="Lead Free", Length=0.039inch, Manufacturer Part Number=RT0402BRE0727KL, Number of Terminations=2, Packaging="Tape and Reel", Pricing="1=0.16, 10=0.121, 50=0.0958, 100=0.0858, 500=0.06536, 1000=0.05776, 5000=0.0428 (USD)", RoHS=Yes, RoHS Compliant=Yes, Series=RT, Stock=20118, Supplier=Digikey, Width=0.02inch
R28: library part RC0402FR-07100KL, "RES 100K OHM 1% 1/16W 0402", Case Code (Imperial)=0402, Case Code (Metric)=1005, LCSC Part Number=C60491, Manufacturer=Yageo, Max Operating Temperature=155°C, Max Power Dissipation=63mW, Min Operating Temperature=-55°C, Package Quantity=1, Resistance=100kR, Resistance Tolerance=1%, Resistor Type="Thick Film", Supplier Part Number 1=603-RC0402FR-07100KL, Temperature Coefficient=100ppm/°C, Voltage Rating=50V, Case/Package=0402, Category="Chip SMD Resistors", ComponentLink1Description=https://datasheet.ciiva.com/11819/0900766b80c66297-11819452.pdf?src-supplier=RSComponents, ComponentLink1URL=https://datasheet.ciiva.com/11819/0900766b80c66297-11819452.pdf?src-supplier=RSComponents, ComponentLink2Description=https://datasheet.ciiva.com/22747/1018594-22747509.pdf?src-supplier=Element14, ComponentLink2URL=https://datasheet.ciiva.com/22747/1018594-22747509.pdf?src-supplier=Element14, ComponentLink3Description=https://datasheet.ciiva.com/2453/pyu-r-int-thick-7-2453362.pdf?src-supplier=Digi-Key, ComponentLink3URL=https://datasheet.ciiva.com/2453/pyu-r-int-thick-7-2453362.pdf?src-supplier=Digi-Key, ComponentLink4Description=https://datasheet.ciiva.com/2453/pyu-r-int-thick-7-2453363.pdf?src-supplier=Digi-Key, ComponentLink4URL=https://datasheet.ciiva.com/2453/pyu-r-int-thick-7-2453363.pdf?src-supplier=Digi-Key, ComponentLink5Description=https://datasheet.ciiva.com/2453/pyu-r-int-thick-7-2453361.pdf?src-supplier=Digi-Key, ComponentLink5URL=https://datasheet.ciiva.com/2453/pyu-r-int-thick-7-2453361.pdf?src-supplier=Digi-Key, ComponentLink6Description=https://datasheet.ciiva.com/12667/pyu-rc0402-51-rohs-l-6-r-12667930.pdf?src-supplier=Mouser, ComponentLink6URL=https://datasheet.ciiva.com/12667/pyu-rc0402-51-rohs-l-6-r-12667930.pdf?src-supplier=Mouser, ComponentLink7Description=https://datasheet.ciiva.com/15189/getdatasheetpartid-323696-15189334.pdf?src-supplier=Verical, ComponentLink7URL=https://datasheet.ciiva.com/15189/getdatasheetpartid-323696-15189334.pdf?src-supplier=Verical, Construction=Rectangular, Depth=0.5mm, Features="Moisture Resistant", Height=0.016inch, Item Type=Resistor, Lead Free="Lead Free", Length=0.039inch, Manufacturer Part Number=RC0402FR-07100KL, Military Standard=Not, Number of Terminations=2, Packaging="Tape and Reel", Power Rating=63mW, Pricing 1="1=0.10000, 10=0.01200, 50=0.01200, 100=0.00500, 1000=0.00300, 2500=0.00200, 10000=0.00100 (USD)", REACH SVHC="No SVHC", RoHS=Yes, RoHS Compliant=Yes, Series=RC, Stock 1=7759549, Supplier 1=Mouser, Technology="THICK FILM", Termination=SMD/SMT, Tolerance=1%, Width=0.02inch, Working Voltage=50V
R30: library part RC0402FR-0733KL, "RES 33K OHM 1% 1/16W 0402", LCSC Part Number=C138003, Manufacturer=YAGEO, Package=0402, ComponentLink1Description=LCSC, ComponentLink1URL=https://www.lcsc.com/product-detail/Chip-Resistor-Surface-Mount_YAGEO-RC0402FR-0733KL_C138003.html, Item Type=Resistor, Manufacturer Part Number=RC0402FR-0733KL
R31 R34: library part AC0402FR-070RL, "RESISTOR 0402 JUMPER ZERO OHM", Case Code (Imperial)=0402, Case Code (Metric)=1005, LCSC Part Number=C226739, Manufacturer=Yageo, Max Operating Temperature=155°C, Min Operating Temperature=-55°C, Power Rating=62.5mW, Supplier Part Number=13-AC0402FR-070RLDKR-ND, Temperature Coefficient=200ppm/°C, Tolerance=1%, Voltage Rating=50V, Case/Package=0402, Category="Chip SMD Resistors", ComponentLink1Description=https://datasheet.ciiva.com/12656/pyu-ac-51-rohs-l-2-12656734.pdf?src-supplier=Mouser, ComponentLink1URL=https://datasheet.ciiva.com/12656/pyu-ac-51-rohs-l-2-12656734.pdf?src-supplier=Mouser, ComponentLink2Description=LCSC, ComponentLink2URL=https://www.lcsc.com/product-detail/Chip-Resistor-Surface-Mount_YAGEO-AC0402FR-070RL_C226739.html, Height=370um, Item Type=Resistor, Manufacturer Part Number=AC0402FR-070RL, Packaging="Tape and Reel", Pricing="1=0.1, 10=0.017, 25=0.0132, 50=0.01, 100=0.0071, 250=0.00568, 500=0.00454, 1000=0.00335, 5000=0.0024 (USD)", RoHS=Yes, Series=AC, Stock=337140, Supplier=Digi-Key, Termination=SMD/SMT
RT1: "±10% 1MΩ Plugin Variable Resistors/Potentiometers ROHS", LCSC Part Number=C118944, Manufacturer=BOCHEN, Package=Plugin, ComponentLink1Description=LCSC, ComponentLink1URL=https://www.lcsc.com/product-detail/Variable-Resistors-Potentiometers_BOCHEN-Chengdu-Guosheng-Tech-3296W-1-105_C118944.html, Item Type=Potentiometers, Manufacturer Part Number=3296W-1-105
SW1: "4.5mm 3.5mm 50mA Round Button Straight 4.5mm 260gf 12V Plugin Tactile Switches ROHS", LCSC Part Number=C2888490, Manufacturer=BZCN, Package=Plugin, ComponentLink1Description=LCSC, ComponentLink1URL=https://jlcpcb.com/partdetail/Bzcn-TSC016A03526A/C2888490, Item Type="Tactile Switch", Manufacturer Part Number=TSC016A03526A
U1: "IC INVERTER 6CH 1-INP 14SO", LCSC Part Number=C6739, Manufacturer=Nexperia, Supplier Part Number=4111431, ComponentLink1Description=https://datasheet.octopart.com/HEF4069UBT%2C653-Nexperia-datasheet-11793750.pdf?src-supplier=Farnell, ComponentLink1URL=https://datasheet.octopart.com/HEF4069UBT%2C653-Nexperia-datasheet-11793750.pdf?src-supplier=Farnell, ComponentLink2Description=https://datasheet.octopart.com/HEF4069UBT%2C653-Nexperia-datasheet-62331911.pdf?src-supplier=Element14, ComponentLink2URL=https://datasheet.octopart.com/HEF4069UBT%2C653-Nexperia-datasheet-62331911.pdf?src-supplier=Element14, ComponentLink3Description=https://assets.nexperia.com/documents/data-sheet/HEF4069UB.pdf?src-supplier=Digikey, ComponentLink3URL=https://assets.nexperia.com/documents/data-sheet/HEF4069UB.pdf?src-supplier=Digikey, ComponentLink4Description=https://datasheet.octopart.com/HEF4069UBT%2C653-NXP-Semiconductors-datasheet-8884867.pdf?src-supplier=Newark, ComponentLink4URL=https://datasheet.octopart.com/HEF4069UBT%2C653-NXP-Semiconductors-datasheet-8884867.pdf?src-supplier=Newark, ComponentLink5Description=https://datasheet.octopart.com/HEF4069UBT%2C653-Nexperia-datasheet-10127420.pdf?src-supplier=Future+Electronics, ComponentLink5URL=https://datasheet.octopart.com/HEF4069UBT%2C653-Nexperia-datasheet-10127420.pdf?src-supplier=Future+Electronics, Item Type=IC, Manufacturer Part Number=HEF4069UBT,653, Pricing="2500=0.109, 7500=0.106, 10000=0.105, 25000=0.103, 37500=0.1 (USD)", RoHS=Yes, RoHS Compliant=Yes, Stock=2500, Supplier="Future Electronics"
U2 U3: "70V 5kV 50mA 100mV@1mA,20mA 1 6V 1.2V DC SMD-4 Transistor Output Optocoupler ROHS", LCSC Part Number=C2936043, Manufacturer=Slkor, Package=SMD-4, ComponentLink1Description=LCSC, ComponentLink1URL=https://www.lcsc.com/product-detail/Transistor-Output-Optocoupler_Slkor-SLKORMICRO-Elec-PC817C_C2936043.html, Item Type=IC, Manufacturer Part Number=PC817C
U4: "NO SOP-8 Timers ROHS", LCSC Part Number=C18723595, Manufacturer=XBLW, Package=SOP-8, ComponentLink1Description=LCSC, ComponentLink1URL=https://www.lcsc.com/product-detail/Timers_span-style-background-color-ff0-XBLW-span-NE555DTR-XBLW_C18723595.html, Item Type=IC, Manufacturer Part Number=NE555DTR(XBLW)
U5: "LDO Voltage Regulators 500mA LOW NOISE LDO", Manufacturer=MaxLinear, Supplier Part Number 1=701-SPX3819M5-L-18TR, ComponentLink1Description=https://www.exar.com/content/document.ashx?id=22106&src-supplier=Digi-Key, ComponentLink1URL=https://www.exar.com/content/document.ashx?id=22106&src-supplier=Digi-Key, Item Type=IC, Manufacturer Part Number=SPX3819M5-L-1-8/TR, Pricing 1="1=0.68000, 10=0.57700, 50=0.57700, 100=0.40000, 1000=0.26200, 10000=0.21000 (USD)", RoHS=Yes, RoHS Compliant=Yes, Stock 1=19446, Supplier 1=Mouser

## Free pads (board coordinates)
  round 125.98 hole 86.61: MH(0,0) MH(0,2304) MH(2899,0) MH(2899,2304)

## Via types
v1: diameter 24, hole 12, Top Layer to Bottom Layer, tented both sides, 46 vias
v2: diameter 24.02, hole 12.2, Top Layer to Bottom Layer, 22 vias
v3: diameter 24, hole 12, Top Layer to Bottom Layer, 12 vias

## Nets (pads, with @x,y where several pads share a name; then routed paths per layer and width w, separated by ;. In a path a pad name is that pad's centre, name@x,y a point inside that pad or via, vN(x,y) a via of type N, cw(c..) or ccw(c..) an arc to the next point about the centre after c; other vN are vias at no path point)
12VIN1: J4.2 J5.2 | length 0
12VIN2: J6.2 J7.2
12VIN3: J8.2 J9.2
+5V: R14.2 R19.2 R25.2 R31.1 R34.2 | length 3965.3
  Top Layer w12: v1@602,987 603.75,988.75 631.25,988.75 R14.2 ; 2674,1616 R34.2
  Top Layer w20: v1@1148,990 2624,990 2693,1059 2693,1609
  Top Layer w25: v1(502,990) v1(502,1291) ; v1(502,1414) 539.5,1451.5 R19.2 ; v1(502,1867) 535,1867 575.5,1907.5 R25.2
  Bottom Layer w20: v1(502,990) v1(606,990) v1(1147,990)
  Bottom Layer w25: v1(502,1291) v1(502,1414) v1(502,1867)
+12V: C3.2 D2.1 D4.1 J2.1 J2.3 J2.5 J3.2 J10.1 K1.1 K1.5 K2.1 R5.1 R11.2 R12.1 R13.2 R18.2 R24.2 R31.2 RT1.3 U1.11 U1.13 U1.14 U2.4 U3.4 U4.4 U4.8 U5.1 U5.3 | length 1083.9
  Top Layer w12: R11.2 R11.2@2589,38 ; v1(2617.5,380) R5.1
  Top Layer w18: v1(2588,9) R11.2@2588,37
  Top Layer w20: U1.11 743,89.28 754.72,101 831.28,101 ; U1.13 843,89.28 831.28,101 ; U1.14@894,41.7 894,89.28 882.28,101 831.28,101 ; v1(2415,1595) C3.2 2507.82,1595 U5.1 ; R31.2 v1(2637,1712)
  Top Layer w25: R18.2 809,1489 844,1524 ; v1(666.5,948.5) R13.2
  Top Layer w39.37: 759,1026 808.5,1026 848,1065.5 848,1088 ; K2.1 K2.1@1549.11,1368
  Bottom Layer w25: 666.5,800.5 v1(666.5,948.5)
  other v1: 2375,1512
  other v2: 1622,274 1473,329.99
FLOWSENSOROUT: J10.2 R4.1 R10.1 R21.2 U1.9 | length 5455.7
  Top Layer w15: v1(733,2049) 976,2049 1008,2017 R10.1
  Top Layer w16: R4.1@1238,1156 1239,1155 1239,1150 v1(1259,1130)
  Top Layer w20: v1(540,1332.5) 540,1130 540,356 510,326 J10.2 336,326 317,307 317,175 341,151 616,151 643,124 U1.9 643,-6.93 654.72,-18.65 2154.35,-18.65 2172.5,-0.5 R21.2
  Bottom Layer w16: v1(541,1130) v1@1258.95,1130
  Bottom Layer w20: v1(540,1332.5) 540,2015 574,2049 v1(733,2049)
GND: C1.1 C2.1 C3.1 C4.1 J1.2 J2.2 J2.4 J2.6 J10.3 LED1.2 LED5.2 LED6.2 Q2.3 Q4.3 Q5.2 Q6.2 Q8.2 R1.1 R6.1 R7.1 R17.1 R23.1 R29.1 R30.1 SW1.1 SW1.2 U1.5 U1.7 U4.1 U5.2 | length 850
  Top Layer w10: Q8.2 Q8.2@669.55,1835.84
  Top Layer w11.81: v2@1622.27,309.66 U4.1
  Top Layer w12: v1(895.5,134.5) R1.1 ; LED5.2 994.95,1780.06 v1(995,1780) ; v1(1918,139) 1918.5,138.5 1918.5,109.5 C1.1 ; v1(2617.5,261) R7.1
  Top Layer w14: v1(2415,1558) C3.1 2450.5,1557.5 2507.32,1557.5 U5.2
  Top Layer w15: R23.1 v3(688.92,1524.5) ; R29.1 v3(690.92,1979.5) ; Q6.2 v3(699.32,1379.69) ; Q8.2 v3(699.32,1835.69) ; R17.1 v3(705.92,1061.5) ; Q5.2 v3(713.32,917.69) ; LED1.2@972.63,959 v1(995,959)
  Top Layer w20: U1.7 v2(593,310) ; v1(693,206) U1.5 ; C2.1@1473.5,140 v3(1504,140) ; U4.1 1623.83,448.23 1650.23,448.23 v2(1651,449) ; R30.1 v1(2564.5,1514) ; v1(2564.5,1583.5) C4.1
  other v1: 2564.5,1548.75
  other v2: 1191,148 1246,148 1301,148 1191,203 1246,203 1301,203 2075,283 2130,283 2185,283 1548,309.66 1585,309.66 1622,309.66 631,312 676,312 955.71,1101.99 997.36,1101.99 1039,1101.99
  other v3: 136,33 472,33 22,1522 22,1858
GNDINFAN: J4.1 J6.1 J8.1 K2.5
GNDOUTFAN: J5.1 J7.1 J9.1 K2.2
INITIALSIGNAL: D1.2 U4.3 | length 289.9
  Top Layer w12: D1.2 1437.26,253.26 1522.27,338.27 U4.3
NetC1_2: C1.2 RT1.1 | length 115
  Top Layer w16: RT1.1 C1.2
NetC2_2: C2.2 U4.5 | length 51.4
  Top Layer w20: U4.5 1472.64,229.77 C2.2@1472.64,178.86
NetC4_2: C4.2 R28.2 R34.1 U5.5 | length 118.5
  Top Layer w20: U5.5 2611.99,1592.59 2629.41,1592.59 2657,1565 R28.2
NetD1_1: D1.1 Q1.3 R2.1 | length 1544.9
  Top Layer w15: R2.1 1081.5,947.5 1102,968 Q1.3@1102,1074
  Top Layer w20: Q1.3 979,1071 875,967 875,393 900,368 1340.82,368 1344.35,371.53 1352.54,371.53 1376,394.99 D1.1
NetD2_2: D2.2 K1.4 Q2.1 | length 655.5
  Bottom Layer w50: Q2.1 1203,800.95 1203,949 1251,997 1435.78,997 K1.4
NetD3_1: D3.1 Q1.1 | length 272.4
  Top Layer w25: Q1.1 1371.95,1140.95 1403.72,1140.95 1492.77,1230 D3.1
NetD4_2: D4.2 K2.4 Q4.1 | length 647.6
  Bottom Layer w50: Q4.1 1206,1555.95 1206,1707 1262.57,1763.57 1453.13,1763.57 K2.4
NetJ1_1: J1.1 K1.2 | length 5.4
  Bottom Layer w50: J1.1@2867.2,618.8 J1.1@2871,615
NetJ3_1: J3.1 R1.2 U1.1 U1.3 | length 1361.2
  Top Layer w20: U1.3 793,184 805.5,171.5 905.5,171.5 ; U1.1@893,237 893,184 905.5,171.5 ; U1.1 893,246.72 U1.1@896.19,243.53 ; R1.2 905.5,171.5
  Top Layer w25: v1(792,426) 893,325 U1.1
  Bottom Layer w25: J3.1 596.21,621.79 v1(792,426)
NetLED1_1: LED1.1 U2.2
NetLED2_2: LED2.2 R6.2 | length 367.9
  Top Layer w12: v3(2543,459) 2568,459 2580.5,471.5 R6.2
  Bottom Layer w12: LED2.2 2327,459 v3(2543,459)
NetLED3_1: LED3.1 R5.2 | length 118
  Top Layer w15: LED3.1@2462,408.5 R5.2@2580,408.5
NetLED3_2: LED3.2 U1.4 | length 1968.6
  Top Layer w16: v2(2172.01,385.01) 2246.01,459 2412,459 LED3.2
  Top Layer w20: v1(743,196) U1.4
  Bottom Layer w16: v1(743,196) 743,303 824,384 2171.01,384 v2(2172.01,385.01)
NetLED4_1: LED4.1 U1.8 | length 2320.2
  Top Layer w20: U1.8 593,-28 614,-49 v1(2558,-49)
  Bottom Layer w20: LED4.1 2558,93 v1(2558,-49)
NetLED4_2: LED4.2 R7.2 | length 118.5
  Top Layer w15: LED4.2 R7.2
NetLED5_1: LED5.1 U3.2
NetLED6_1: LED6.1 Q7.3 | length 166.4
  Top Layer w20: Q7.3 2276.5,39.5 2276.5,188.5 LED6.1 LED6.1@2277,205
NetQ1_2: Q1.2 R4.2 | length 84.7
  Top Layer w12: R4.2@1201,1156 R4.2@1201.5,1155.5
  Top Layer w15: Q1.2 R4.2@1202,1155
NetQ2_2: Q2.2 R3.2 | length 190.4
  Top Layer w25: 1125,776 1125,793.57 1146.43,815 Q2.2
NetQ3_2: Q3.2 R10.2 | length 177.7
  Top Layer w15: R10.2 1152,1902 Q3.2
NetQ3_3: Q3.3 R8.1 | length 113.8
  Top Layer w16: R8.1 1059,1809 Q3.3
NetQ4_2: Q4.2 R9.2 | length 215.1
  Top Layer w25: R9.2 1125,1546 1152,1573 Q4.2
NetQ5_1: Q5.1 R16.2
NetQ6_1: Q6.1 R22.2
NetQ7_1: Q7.1 R11.1 | length 75.4
  Top Layer w20: Q7.1 2477,38 R11.1
NetQ7_2: Q7.2 R21.1 | length 236.3
  Top Layer w18: R21.1 2209.5,1.5 2231,-20 2317,-20 Q7.2
NetQ8_1: Q8.1 R27.2
NetR2_2: R2.2 U2.1
NetR3_1: R3.1 U2.3
NetR8_2: R8.2 U3.1
NetR9_1: R9.1 U3.3 | length 192
  Top Layer w18: U3.3 955,1433
NetR12_2: R12.2 SW1.3 SW1.4 U4.2 | length 444.8
  Top Layer w12: U4.2@1571.64,447.3 U4.2
  Top Layer w15: U4.2@1571.64,447.3 R12.2 1655.52,506.36 SW1.3
  Top Layer w20: SW1.4 SW1.3
NetR28_1: R28.1 R30.2 U5.4
NetRT1_2: RT1.2 U4.6 U4.7 | length 247
  Bottom Layer w12: v1(1551,187) 1667,187 1705.58,148.42 RT1.2
PWM1: J4.4 R16.1 | length 2150.8
  Top Layer w20: R16.1 751.5,912.5 894,1055 v1(894,1356) ; v1(1163.59,1714.07) 1215.52,1766 1783,1766 1837,1820 J4.4
  Bottom Layer w20: v1(894,1356) 1107,1356 1163.59,1412.59 v1(1163.59,1714.07)
PWM1_OUT: J5.4 Q5.3 R14.1 | length 259.6
  Bottom Layer w20: J5.4 601.92,905 629.92,877 v1(631,877)
PWM2: J6.4 R22.1 | length 1274.8
  Top Layer w12: R22.1 R22.1@737.75,1341.25
  Top Layer w20: R22.1@737.75,1341.25 v1(737.75,1379.69)
  Bottom Layer w20: v1(737.75,1379.69) 737.75,1784.75 934,1981 1330,1981 1374.36,2025.36 J6.4@1374.36,2120
PWM2_OUT: J7.4 Q6.3 R19.1 | length 287.5
  Top Layer w20: J7.4 509.64,1362.64 560,1413 613,1413 617,1409 617,1387.5 ; 618,1405 R19.1
PWM3: J8.4 R27.1 | length 393.3
  Top Layer w15: R27.1 v1@737.5,1829.19
  Bottom Layer w20: v1(737,1829.69) 908,2000.69 J8.4@908,2120
PWM3_OUT: J9.4 Q8.3 R25.1 | length 235.6
  Top Layer w20: J9.4@383,1816 Q8.3
TACH1: J4.3 R15.1 R17.2 | length 2151.3
  Top Layer w20: 653,1099 746,1099 775,1128 v1(775,1396) ; v1(1135.59,1681) 1183,1681 1239.23,1737.23 1800.23,1737.23 1937,1874 J4.3
  Bottom Layer w20: v1(775,1396) 1090,1396 1135.59,1441.58 v1(1135.59,1681)
TACH1_OUT: J5.3 R13.1 R15.2 | length 234.4
  Bottom Layer w25: J5.3 449,1005 472.59,1028.59 v1(607.59,1028.59)
TACH2: J6.3 R20.1 R23.2 | length 1241.4